# Altium PCB FullSheetOLD.PcbDoc (part 5 of 8)
Units mm, origin at the board's own origin, x right, y up, seen from the top; angles counter-clockwise.
Board outline 132.46 x 194.44 mm, 4 copper layers (Top Copper, L2_GND, L3_PWR_SIG, Bottom Copper), stack 1.586 mm thick; 495 components, 210 nets, 2171 pads, 1027 vias.
Unrouted connection lines stored in the file: 53.
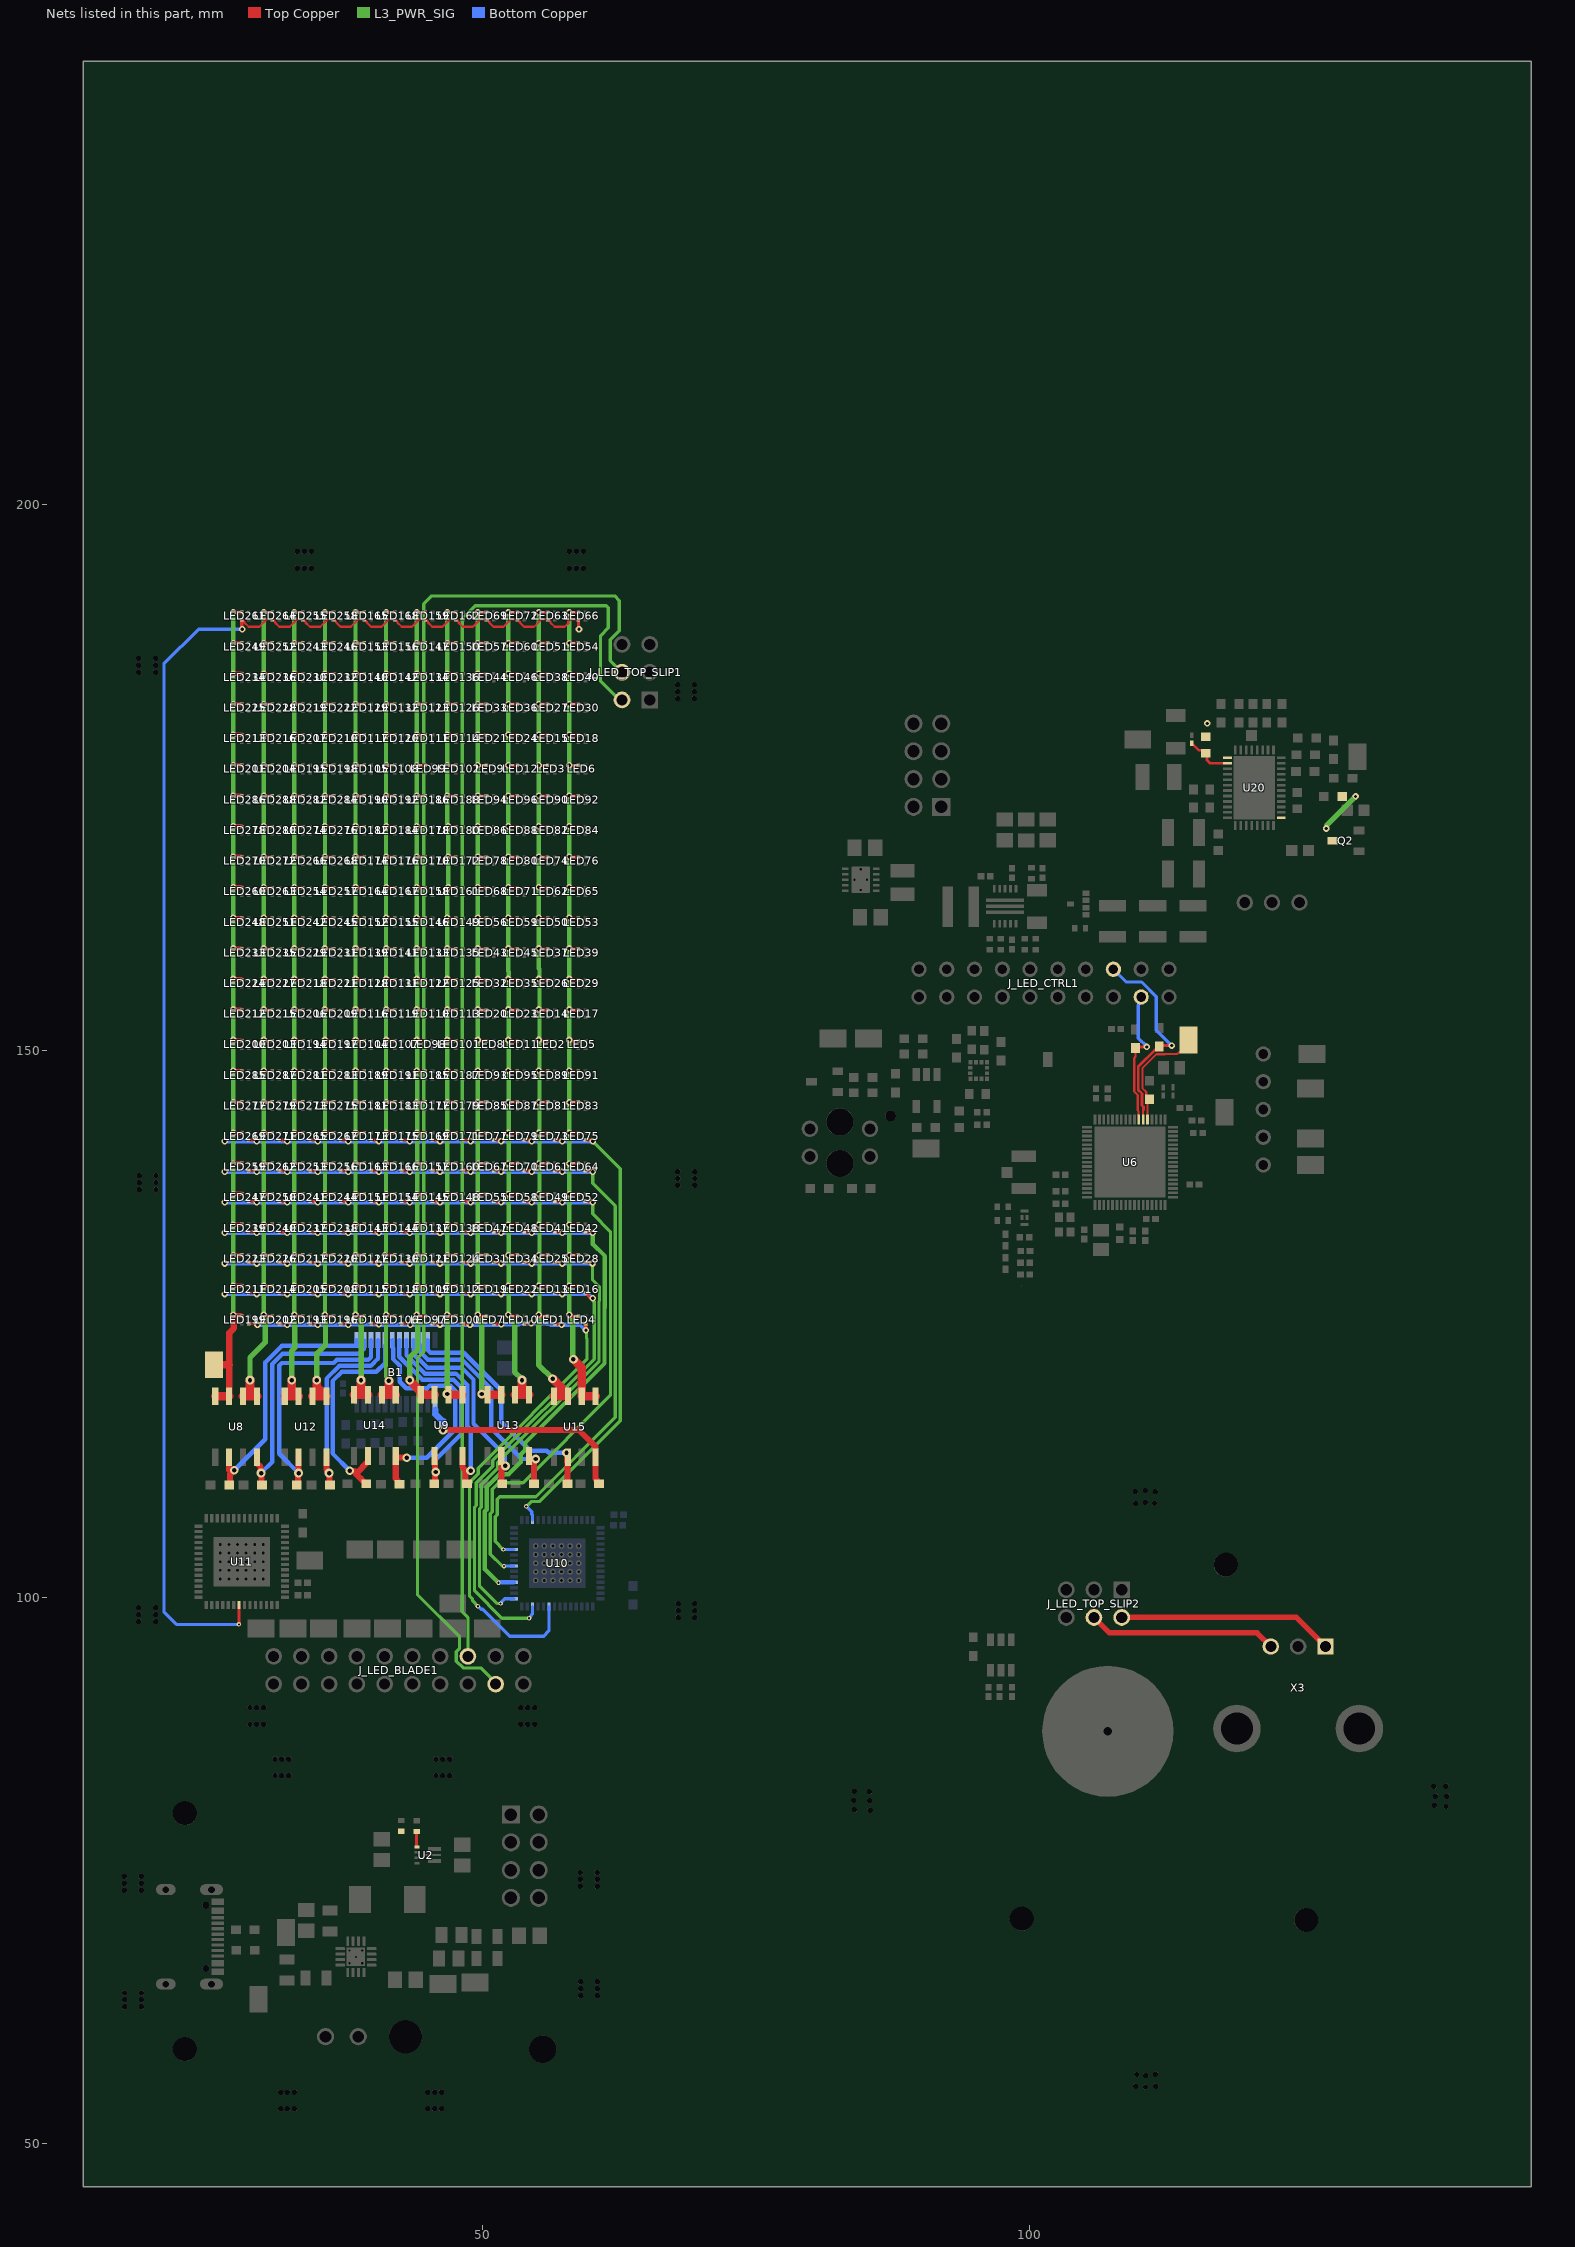
[diagram p6: the nets of this part, all layers, seen from the top]

## Via types
v1: diameter 0.6, hole 0.3, Top Copper to Bottom Copper, 857 vias
v2: diameter 0.8, hole 0.4, Top Copper to Bottom Copper, 91 vias
v3: diameter 0.4, hole 0.2, Top Copper to Bottom Copper, 79 vias

## Nets (pads, with @x,y where several pads share a name; then routed paths per layer and width w, separated by ;. In a path a pad name is that pad's centre, name@x,y a point inside that pad or via, vN(x,y) a via of type N, cw(c..) or ccw(c..) an arc to the next point about the centre after c; other vN are vias at no path point) (continued)
B23: LED63.1 LED66.1 LED69.1 LED72.1 LED159.1 LED162.1 LED165.1 LED168.1 LED255.1 LED258.1 LED261.1 LED264.1 U11.35 | length 143.6
  Top Copper w0.2: LED261.1@27.94,189.47 28.005,189.405 28.068,189.405 28.185,189.288 28.185,189.201 28.579,188.807 29.55,188.807 30.213,189.47 LED264.1@30.74,189.47 30.805,189.405 30.868,189.405 30.985,189.288 30.985,189.201 31.379,188.807 32.344,188.807 33.007,189.47 LED255.1@33.54,189.47 33.605,189.405 33.668,189.405 33.785,189.288 33.785,189.201 34.179,188.807 35.138,188.807 35.801,189.47 LED258.1@36.34,189.47 36.405,189.405 36.468,189.405 36.585,189.288 36.585,189.201 36.979,188.807 37.932,188.807 38.595,189.47 LED165.1@39.14,189.47 39.205,189.405 39.268,189.405 39.385,189.288 39.385,189.201 39.779,188.807 40.726,188.807 41.389,189.47 LED168.1@41.94,189.47 42.005,189.405 42.068,189.405 42.185,189.288 42.185,189.201 42.579,188.807 43.52,188.807 44.183,189.47 LED159.1@44.74,189.47 44.805,189.405 44.868,189.405 44.985,189.288 44.985,189.201 45.379,188.807 46.314,188.807 46.977,189.47 LED162.1@47.54,189.47 47.605,189.405 47.668,189.405 47.785,189.288 47.785,189.201 48.179,188.807 49.108,188.807 49.771,189.47 LED69.1@50.34,189.47 50.405,189.405 50.468,189.405 50.585,189.288 50.585,189.201 50.979,188.807 51.902,188.807 52.565,189.47 LED72.1@53.14,189.47 53.205,189.405 53.268,189.405 53.385,189.288 53.385,189.201 53.779,188.807 54.696,188.807 55.359,189.47 LED63.1@55.94,189.47 56.005,189.405 56.068,189.405 56.185,189.288 56.185,189.201 56.579,188.807 57.49,188.807 57.812,189.129 57.812,189.353 57.929,189.47 LED66.1@58.74,189.47
  Top Copper w0.3: v3(27.686,97.536) 27.703,97.553 U11.35@27.703,99.316 ; v1@27.95,188.638 LED261.1@27.95,189.452 ; LED66.1@58.74,189.47 58.755,189.455 58.755,188.641 v1(58.801,188.595)
  Bottom Copper w0.3: v3(27.686,97.536) 23.84,97.536 23.834,97.53 23.047,97.53 23.041,97.536 21.971,97.536 20.828,98.679 20.828,185.42 24,188.592 v1(27.996,188.592)
BOOT0: R17.2 TP7.1 U6.5 | length 11.6
  Top Copper w0.2: U6.5@110.82,143.751 110.82,145.378 110.698,145.5 110.698,146.25 110.348,146.6 110.348,148.426 111.629,149.707 112.391,149.707 112.406,149.722 113.53,149.722 113.686,149.878 113.829,149.878 114.554,150.603 TP7.1@114.554,151.003 cw(c114.556,150.803) 114.556,151.003 114.639,151.003 114.698,150.944 114.718,150.924 TP7.1@115.232,149.986
COL0_GATE: B1.1 R18.1 U8.2 | length 23.5
  Top Copper w0.55: R18.1@26.797,110.288 26.85,110.341 26.85,111.31 26.898,111.358 ; U8.2@26.797,112.827 26.801,112.822 26.801,111.644 v2@27.011,111.434 ; v2@27.011,111.379 v2@27.011,111.434 ; v2(27.272,111.64) 27.217,111.64 v2@27.011,111.434
  Bottom Copper w0.4: v2(27.272,111.64) 30.099,114.467 30.099,121.506 31.609,123.017 38.443,123.017 38.468,123.042 B1.1@38.468,123.554
COL1_GATE: B1.2 R20.1 U8.4 | length 22.9
  Top Copper w0.55: U8.4@29.337,112.827 29.337,112.292 29.67,111.959 29.67,111.427 v2(29.718,111.379) 29.762,111.335 29.762,110.332 R20.1@29.806,110.288
  Bottom Copper w0.4: v2(29.718,111.379) 30.734,112.395 30.734,121.364 31.67,122.3 38.671,122.3 39.093,122.722 39.093,123.529 B1.2@39.118,123.554
COL2_GATE: B1.3 R24.1 U12.2 | length 23.5
  Top Copper w0.55: R24.1@32.981,110.288 33.099,110.406 33.099,111.331 v2(33.147,111.379) U12.2@33.147,112.827
  Bottom Copper w0.4: v2(33.147,111.379) 31.369,113.157 31.369,121.221 31.603,121.455 36.361,121.455 36.656,121.75 39.534,121.75 39.768,121.984 B1.3@39.768,123.554
COL3_GATE: B1.4 R26.1 U12.4 | length 18.6
  Top Copper w0.55: U12.4@35.687,112.827 35.691,112.822 35.691,111.696 35.941,111.447 v2(35.941,111.379) 35.985,111.335 35.985,110.332 R26.1@36.029,110.288
  Bottom Copper w0.4: v2(35.941,111.379) 35.941,111.487 35.709,111.719 35.709,120.025 36.884,121.2 39.762,121.2 40.418,121.856 B1.4@40.418,123.554
COL4_GATE: B1.5 R28.1 U14.2 | length 20.2
  Top Copper w0.55: v2(37.839,111.6) 37.887,111.552 38.285,111.552 38.458,111.379 ; R28.1@39.331,110.415 39.281,110.415 38.848,110.847 38.848,110.876 38.345,111.379 38.458,111.379 ; U14.2@39.497,112.953 39.493,112.948 39.493,112.414 38.458,111.379
  Bottom Copper w0.4: v2(37.839,111.6) 36.259,113.18 36.259,119.798 37.111,120.65 40.259,120.65 41.068,121.459 B1.5@41.068,123.092
COL5_GATE: B1.6 R30.1 U14.4 | length 22.6
  Top Copper w0.55: R30.1@42.252,110.415 42.252,110.656 42.037,110.871 U14.4@42.037,112.953 42.037,112.828 42.041,112.824 43.005,112.824 v2(43.053,112.776)
  Bottom Copper w0.4: B1.6@41.718,123.554 41.743,123.529 41.743,122.85 41.793,122.8 41.793,121.821 42.395,121.219 42.395,119.74 42.996,119.138 44.907,119.138 45.137,119.368 47.047,119.368 47.486,118.929 47.486,115.386 44.876,112.776 v2(43.053,112.776)
COL6_GATE: B1.7 R19.1 U9.2 | length 19.7
  Top Copper w0.55: R19.1@45.554,110.415 45.624,110.485 45.624,111.415 v2(45.694,111.485) 45.643,111.535 45.643,112.903 U9.2@45.593,112.954
  Bottom Copper w0.4: B1.7@42.368,123.554 42.368,122.023 44.473,119.918 47.325,119.918 48.036,119.207 48.036,114.965 45.694,112.623 v2(45.694,111.485)
COL7_GATE: B1.8 R21.1 U9.4 | length 19.2
  Top Copper w0.55: U9.4@48.133,112.954 48.137,112.949 48.137,111.916 48.387,111.666 48.387,111.598 ; R21.1@48.563,110.415 48.438,110.54 48.435,110.54 48.435,111.567 48.852,111.567 v2(48.883,111.598)
  Bottom Copper w0.4: B1.8@43.018,123.554 43.018,122.151 44.688,120.481 47.54,120.481 48.586,119.435 48.586,115.687 48.883,115.39 v2(48.883,111.598)
COL8_GATE: B1.9 R25.1 U13.2 | length 19.5
  Top Copper w0.55: U13.2@51.689,112.954 51.689,112.419 v2(52.069,112.039) ; v2@51.693,111.956 51.693,111.506 51.693,110.498 R25.1@51.777,110.415
  Bottom Copper w0.4: B1.9@43.668,123.554 43.693,123.529 43.693,122.254 44.916,121.031 48.057,121.031 49.149,119.939 49.149,115.902 52.011,113.039 52.011,112.097 v2(52.069,112.039)
COL9_GATE: B1.10 R27.1 U13.4 | length 20.5
  Top Copper w0.55: U13.4@54.229,112.954 54.229,112.726 54.233,112.722 54.797,112.722 v2(54.845,112.674) ; R27.1@54.698,110.415 v2@54.698,112.674
  Bottom Copper w0.4: B1.10@44.318,123.092 44.318,122.407 44.958,121.767 48.099,121.767 50.758,119.108 50.758,115.485 53.569,112.674 v2(54.845,112.674)
COL10_GATE: B1.11 R29.1 U15.2 | length 22.1
  Top Copper w0.55: v2(57.664,113.241) 57.712,113.193 57.712,112.327 57.765,112.273 57.765,110.54 57.746,110.52 R29.1@57.746,110.415
  Bottom Copper w0.4: B1.11@44.968,123.554 44.968,122.641 45.217,122.392 48.252,122.392 51.689,118.955 51.689,116.078 54.343,113.424 55.858,113.424 56.041,113.241 v2(57.664,113.241)
COL11_GATE: B1.13 R31.1 U15.4 | length 19.8
  Top Copper w0.55: v2(46.355,115.316) 58.801,115.316 60.321,113.796 60.321,112.831 U15.4@60.325,112.827 ; U15.4@60.321,112.288 60.321,110.862 60.453,110.73 60.453,110.54 60.578,110.415 R31.1@60.628,110.415
  Bottom Copper w0.55: 45.668,116.765 B1.13@45.668,117.216
  Bottom Copper w0.6: 45.668,116.765 46.355,116.078
  Bottom Copper w0.7: v2(46.355,115.316) 46.355,116.078
COL_SCAN0: LED199.4 LED200.4 LED201.4 LED211.4 LED212.4 LED213.4 LED223.4 LED224.4 LED225.4 LED233.4 LED234.4 LED239.4 LED247.4 LED248.4 LED249.4 LED259.4 LED260.4 LED261.4 LED269.4 LED270.4 LED277.4 LED278.4 LED285.4 LED286.4 TP14.1 U8.7 U8.8 | length 93.3
  Top Copper w0.4: 26.775,121.285 26.797,121.307 ; v1(27.178,125.857) 27.216,125.819 27.851,125.819 LED199.4@27.94,125.73 ; v1(27.178,128.524) 27.184,128.53 LED211.4@27.94,128.53 ; v1(27.178,131.318) 27.928,131.318 LED223.4@27.94,131.33 ; v1(27.178,134.112) 27.196,134.13 LED239.4@27.94,134.13 ; v1(27.178,136.906) 27.202,136.93 LED247.4@27.94,136.93 ; v1(27.178,139.7) 27.208,139.73 LED259.4@27.94,139.73 ; v1(27.178,142.494) 27.904,142.494 LED269.4@27.94,142.53 ; v1(27.178,145.288) 27.898,145.288 LED277.4@27.94,145.33 ; v1(27.178,148.209) 27.216,148.171 27.899,148.171 LED285.4@27.94,148.13 ; v1(27.178,151.003) 27.216,150.965 27.905,150.965 LED200.4@27.94,150.93 ; v1(27.178,153.797) 27.216,153.759 27.911,153.759 LED212.4@27.94,153.73 ; v1(27.178,156.591) 27.216,156.553 27.917,156.553 LED224.4@27.94,156.53 ; v1(27.178,159.385) 27.216,159.347 27.923,159.347 LED233.4@27.94,159.33 ; v1(27.178,162.179) 27.216,162.141 27.929,162.141 LED248.4@27.94,162.13 ; v1(27.178,164.973) 27.897,164.973 LED260.4@27.94,164.93 ; v1(27.178,167.767) 27.903,167.767 LED270.4@27.94,167.73 ; v1(27.178,170.561) 27.909,170.561 LED278.4@27.94,170.53 ; v1(27.178,173.355) 27.915,173.355 LED286.4@27.94,173.33 ; v1(27.178,176.149) 27.921,176.149 LED201.4@27.94,176.13 ; v1(27.178,178.943) 27.927,178.943 LED213.4@27.94,178.93 ; v1(27.178,181.737) 27.933,181.737 LED225.4@27.94,181.73 ; v1(27.178,184.531) LED234.4@27.94,184.53 LED234.4@27.94,184.53 ; v1(27.178,187.325) 27.935,187.325 LED249.4@27.94,187.33 ; v1(27.178,190.119) 27.929,190.119 LED261.4@27.94,190.13
  Top Copper w0.6: U8.7@26.797,118.417 26.797,124.197 27.22,124.62 27.22,125.815 v1(27.178,125.857)
  Top Copper w0.7: TP14.1@25.4,121.285 26.775,121.285
  Top Copper w0.8: U8.8@25.527,118.417 U8.7@26.797,118.417
  L3_PWR_SIG w0.4: v1@27.178,125.803 v1(27.178,125.857) v1(27.178,128.524) v1(27.178,131.318) v1(27.178,134.112) v1(27.178,136.906) v1(27.178,139.7) v1(27.178,142.494) v1(27.178,145.288) v1(27.178,148.209) v1(27.178,151.003) v1(27.178,153.797) v1(27.178,156.591) v1(27.178,159.385) v1(27.178,162.179) v1(27.178,164.973) v1(27.178,167.767) v1(27.178,170.561) v1(27.178,173.355) v1(27.178,176.149) v1(27.178,178.943) v1(27.178,181.737) v1(27.178,184.531) v1(27.178,187.325) v1(27.178,190.119)
COL_SCAN1: LED202.4 LED203.4 LED204.4 LED214.4 LED215.4 LED216.4 LED226.4 LED227.4 LED228.4 LED235.4 LED236.4 LED240.4 LED250.4 LED251.4 LED252.4 LED262.4 LED263.4 LED264.4 LED271.4 LED272.4 LED279.4 LED280.4 LED287.4 LED288.4 U8.5 U8.6 | length 92.2
  Top Copper w0.3: v1@29.845,136.906 LED250.4@30.649,136.906 ; v1@29.845,139.7 LED262.4@30.643,139.7 ; v1@29.845,181.737 LED228.4@30.666,181.737 ; v1@29.846,184.53 LED236.4@30.672,184.53 ; v1@29.847,187.327 LED252.4@30.67,187.327 ; v1@29.851,190.125 LED264.4@30.667,190.125 ; v1@29.851,128.53 LED214.4@30.673,128.53 ; v1@29.857,131.33 LED226.4@30.673,131.33 ; v1@29.858,178.93 LED216.4@30.673,178.93 ; v1@29.863,134.13 LED240.4@30.673,134.13 ; v1@29.864,176.13 LED204.4@30.673,176.13 ; v1@29.87,173.33 LED288.4@30.673,173.33 ; v1@29.876,170.53 LED280.4@30.673,170.53 ; v1@29.881,142.53 LED271.4@30.673,142.53 ; v1@29.882,167.73 LED272.4@30.673,167.73 ; v1@29.883,145.326 LED279.4@30.669,145.326 ; v1@29.883,164.935 LED263.4@30.668,164.935 ; v1@29.894,162.13 LED251.4@30.673,162.13 ; v1@29.9,159.33 LED235.4@30.673,159.33 ; v1@29.987,156.53 LED227.4@30.673,156.53 ; v1@29.993,153.73 LED215.4@30.673,153.73 ; v1@29.999,150.93 LED203.4@30.673,150.93 ; v1@30.005,148.13 LED287.4@30.673,148.13 ; v1@30.053,125.73 LED202.4@30.673,125.73
  Top Copper w0.8: U8.6@28.067,118.417 28.702,118.417 ; v2(28.702,119.888) 28.702,118.417 ; U8.5@29.337,118.417 28.702,118.417
  L3_PWR_SIG w0.4: v1(29.972,125.857) v1(29.972,128.524) v1(29.972,131.318) v1(29.972,134.112) v1(29.972,136.906) v1(29.972,139.7) v1(29.972,142.494) v1(29.972,145.288) v1(29.972,148.209) v1(29.972,151.003) v1(29.972,153.797) v1(29.972,156.591) v1(29.972,159.385) v1(29.972,162.179) v1(29.972,164.973) v1(29.972,167.767) v1(29.972,170.561) v1(29.972,173.355) v1(29.972,176.149) v1(29.972,178.943) v1(29.972,181.737) v1(29.972,184.531) v1(29.972,187.325) v1(29.972,190.119)
  L3_PWR_SIG w0.5: v2(28.702,119.888) 28.702,121.939 30.091,123.327 30.091,125.711 29.972,125.83 v1(29.972,125.857)
COL_SCAN2: LED193.4 LED194.4 LED195.4 LED205.4 LED206.4 LED207.4 LED217.4 LED218.4 LED219.4 LED229.4 LED230.4 LED237.4 LED241.4 LED242.4 LED243.4 LED253.4 LED254.4 LED255.4 LED265.4 LED266.4 LED273.4 LED274.4 LED281.4 LED282.4 U12.7 U12.8 | length 91.7
  Top Copper w0.3: v1@32.639,136.906 LED241.4@33.443,136.906 ; v1@32.639,139.7 LED253.4@33.437,139.7 ; v1@32.639,181.737 LED219.4@33.46,181.737 ; v1@32.64,184.53 LED230.4@33.466,184.53 ; v1@32.641,187.327 LED243.4@33.465,187.327 ; v1@32.645,190.125 LED255.4@33.461,190.125 ; v1@32.645,128.53 LED205.4@33.467,128.53 ; v1@32.651,131.33 LED217.4@33.467,131.33 ; v1@32.652,178.93 LED207.4@33.467,178.93 ; v1@32.657,134.13 LED237.4@33.467,134.13 ; v1@32.658,176.13 LED195.4@33.467,176.13 ; v1@32.664,173.33 LED282.4@33.467,173.33 ; v1@32.67,170.53 LED274.4@33.467,170.53 ; v1@32.675,142.53 LED265.4@33.467,142.53 ; v1@32.676,167.73 LED266.4@33.467,167.73 ; v1@32.677,145.326 LED273.4@33.463,145.326 ; v1@32.677,164.935 LED254.4@33.462,164.935 ; v1@32.688,162.13 LED242.4@33.467,162.13 ; v1@32.694,159.33 LED229.4@33.467,159.33 ; v1@32.781,156.53 LED218.4@33.467,156.53 ; v1@32.787,153.73 LED206.4@33.467,153.73 ; v1@32.793,150.93 LED194.4@33.467,150.93 ; v1@32.799,148.13 LED281.4@33.467,148.13 ; v1@32.847,125.73 LED193.4@33.467,125.73
  Top Copper w0.8: U12.8@31.877,118.417 32.512,118.417 ; v2(32.512,119.888) 32.512,118.417 ; U12.7@33.147,118.417 32.512,118.417
  L3_PWR_SIG w0.4: v1(32.766,125.857) v1(32.766,128.524) v1(32.766,131.318) v1(32.766,134.112) v1(32.766,136.906) v1(32.766,139.7) v1(32.766,142.494) v1(32.766,145.288) v1(32.766,148.209) v1(32.766,151.003) v1(32.766,153.797) v1(32.766,156.591) v1(32.766,159.385) v1(32.766,162.179) v1(32.766,164.973) v1(32.766,167.767) v1(32.766,170.561) v1(32.766,173.355) v1(32.766,176.149) v1(32.766,178.943) v1(32.766,181.737) v1(32.766,184.531) v1(32.766,187.325) v1(32.766,190.119)
  L3_PWR_SIG w0.5: v2(32.512,119.888) 32.512,122.552 32.816,122.856 32.816,125.78 32.766,125.83 v1(32.766,125.857)
COL_SCAN3: LED196.4 LED197.4 LED198.4 LED208.4 LED209.4 LED210.4 LED220.4 LED221.4 LED222.4 LED231.4 LED232.4 LED238.4 LED244.4 LED245.4 LED246.4 LED256.4 LED257.4 LED258.4 LED267.4 LED268.4 LED275.4 LED276.4 LED283.4 LED284.4 U12.5 U12.6 | length 92
  Top Copper w0.3: v1@35.433,136.906 v1(35.56,136.906) LED244.4@36.237,136.906 ; v1@35.433,139.7 v1(35.56,139.7) LED256.4@36.231,139.7 ; v1@35.433,181.737 v1(35.56,181.737) LED222.4@36.254,181.737 ; v1@35.434,184.53 LED232.4@36.26,184.53 ; v1@35.435,187.327 LED246.4@36.258,187.327 ; v1@35.439,190.125 LED258.4@36.255,190.125 ; v1@35.439,128.53 LED208.4@36.261,128.53 ; v1@35.445,131.33 LED220.4@36.261,131.33 ; v1@35.446,178.93 LED210.4@36.261,178.93 ; v1@35.451,134.13 LED238.4@36.261,134.13 ; v1@35.452,176.13 LED198.4@36.261,176.13 ; v1@35.458,173.33 LED284.4@36.261,173.33 ; v1@35.464,170.53 LED276.4@36.261,170.53 ; v1@35.469,142.53 LED267.4@36.261,142.53 ; v1@35.47,167.73 LED268.4@36.261,167.73 ; v1@35.471,145.326 LED275.4@36.257,145.326 ; v1@35.471,164.935 LED257.4@36.256,164.935 ; v1@35.482,162.13 LED245.4@36.261,162.13 ; v1@35.488,159.33 LED231.4@36.261,159.33 ; v1@35.575,156.53 LED221.4@36.261,156.53 ; v1@35.581,153.73 LED209.4@36.261,153.73 ; v1@35.587,150.93 LED197.4@36.261,150.93 ; v1@35.593,148.13 LED283.4@36.261,148.13 ; v1@35.641,125.73 LED196.4@36.261,125.73
  Top Copper w0.8: U12.6@34.417,118.417 35.052,118.417 ; v2(34.798,119.888) 34.798,119.253 35.052,118.999 35.052,118.417 ; U12.5@35.687,118.417 35.052,118.417
  L3_PWR_SIG w0.4: v1(35.56,125.857) v1(35.56,128.524) v1(35.56,131.318) v1(35.56,134.112) v1(35.56,136.906) v1(35.56,139.7) v1(35.56,142.494) v1(35.56,145.288) v1(35.56,148.209) v1(35.56,151.003) v1(35.56,153.797) v1(35.56,156.591) v1(35.56,159.385) v1(35.56,162.179) v1(35.56,164.973) v1(35.56,167.767) v1(35.56,170.561) v1(35.56,173.355) v1(35.56,176.149) v1(35.56,178.943) v1(35.56,181.737) v1(35.56,184.531) v1(35.56,187.325) v1(35.56,190.119)
  L3_PWR_SIG w0.5: v2(34.798,119.888) 34.798,122.298 35.61,123.11 35.61,125.78 35.56,125.83 v1(35.56,125.857)
COL_SCAN4: LED103.4 LED104.4 LED105.4 LED115.4 LED116.4 LED117.4 LED127.4 LED128.4 LED129.4 LED139.4 LED140.4 LED143.4 LED151.4 LED152.4 LED153.4 LED163.4 LED164.4 LED165.4 LED173.4 LED174.4 LED181.4 LED182.4 LED189.4 LED190.4 U14.7 U14.8 | length 91.7
  Top Copper w0.3: v1@38.227,136.906 LED151.4@39.031,136.906 ; v1@38.227,139.7 LED163.4@39.025,139.7 ; v1@38.227,181.737 LED129.4@39.048,181.737 ; v1@38.228,184.53 LED140.4@39.054,184.53 ; v1@38.229,187.327 LED153.4@39.052,187.327 ; v1@38.233,190.125 LED165.4@39.049,190.125 ; v1@38.233,128.53 LED115.4@39.055,128.53 ; v1@38.239,131.33 LED127.4@39.055,131.33 ; v1@38.24,178.93 LED117.4@39.055,178.93 ; v1@38.245,134.13 LED143.4@39.055,134.13 ; v1@38.246,176.13 LED105.4@39.055,176.13 ; v1@38.252,173.33 LED190.4@39.055,173.33 ; v1@38.258,170.53 LED182.4@39.055,170.53 ; v1@38.263,142.53 LED173.4@39.055,142.53 ; v1@38.264,167.73 LED174.4@39.055,167.73 ; v1@38.265,145.326 LED181.4@39.051,145.326 ; v1@38.265,164.935 LED164.4@39.05,164.935 ; v1@38.276,162.13 LED152.4@39.055,162.13 ; v1@38.282,159.33 LED139.4@39.055,159.33 ; v1@38.369,156.53 LED128.4@39.055,156.53 ; v1@38.375,153.73 LED116.4@39.055,153.73 ; v1@38.381,150.93 LED104.4@39.055,150.93 ; v1@38.387,148.13 LED189.4@39.055,148.13 ; v1@38.435,125.73 LED103.4@39.055,125.73
  Top Copper w0.8: U14.8@38.227,118.543 38.862,118.543 ; v2(38.862,119.888) 38.862,118.543 ; U14.7@39.497,118.543 38.862,118.543
  L3_PWR_SIG w0.4: v1(38.354,125.857) v1(38.354,128.524) v1(38.354,131.318) v1(38.354,134.112) v1(38.354,136.906) v1(38.354,139.7) v1(38.354,142.494) v1(38.354,145.288) v1(38.354,148.209) v1(38.354,151.003) v1(38.354,153.797) v1(38.354,156.591) v1(38.354,159.385) v1(38.354,162.179) v1(38.354,164.973) v1(38.354,167.767) v1(38.354,170.561) v1(38.354,173.355) v1(38.354,176.149) v1(38.354,178.943) v1(38.354,181.737) v1(38.354,184.531) v1(38.354,187.325) v1(38.354,190.119)
  L3_PWR_SIG w0.5: v1(38.354,125.857) 38.354,125.83 38.862,125.322 v2(38.862,119.888)
COL_SCAN5: LED106.4 LED107.4 LED108.4 LED118.4 LED119.4 LED120.4 LED130.4 LED131.4 LED132.4 LED141.4 LED142.4 LED144.4 LED154.4 LED155.4 LED156.4 LED166.4 LED167.4 LED168.4 LED175.4 LED176.4 LED183.4 LED184.4 LED191.4 LED192.4 U14.5 U14.6 | length 91.5
  Top Copper w0.3: v1@41.021,136.906 LED154.4@41.825,136.906 ; v1@41.021,181.737 LED132.4@41.842,181.737 ; v1@41.022,184.53 LED142.4@41.848,184.53 ; v1@41.023,187.327 LED156.4@41.846,187.327 ; v1@41.027,190.125 LED168.4@41.843,190.125 ; v1@41.027,128.53 LED118.4@41.849,128.53 ; v1@41.034,178.93 LED120.4@41.849,178.93 ; v1@41.039,134.13 LED144.4@41.849,134.13 ; v1@41.04,176.13 LED108.4@41.849,176.13 ; v1@41.046,173.33 LED192.4@41.849,173.33 ; v1(41.048,131.318) 41.06,131.33 LED130.4@41.849,131.33 ; v1@41.052,170.53 LED184.4@41.849,170.53 ; v1@41.057,142.53 LED175.4@41.849,142.53 ; v1@41.058,167.73 LED176.4@41.849,167.73 ; v1@41.059,145.326 LED183.4@41.845,145.326 ; v1@41.059,164.935 LED167.4@41.844,164.935 ; v1@41.07,162.13 LED155.4@41.849,162.13 ; v1@41.076,159.33 LED141.4@41.849,159.33 ; v1(41.117,139.716) 41.133,139.7 LED166.4@41.819,139.7 ; v1@41.163,156.53 LED131.4@41.849,156.53 ; v1@41.169,153.73 LED119.4@41.849,153.73 ; v1@41.175,150.93 LED107.4@41.849,150.93 ; v1@41.181,148.13 LED191.4@41.849,148.13 ; v1@41.229,125.73 LED106.4@41.849,125.73
  Top Copper w0.8: U14.6@40.767,118.543 41.402,118.543 ; v2(41.409,119.836) 41.409,118.55 41.402,118.543 ; U14.5@42.037,118.543 41.402,118.543
  L3_PWR_SIG w0.4: v1(41.048,131.318) 41.048,131.264 41.148,131.164 v1(41.148,128.524) v1(41.148,125.857) 41.148,120.206 41.409,119.944 v2(41.409,119.836) ; v1(41.117,139.716) 41.132,139.701 41.148,139.685 v1(41.148,136.906) v1(41.148,134.112) v1@41.148,131.318 ; v1@41.148,139.716 v1(41.148,142.494) v1(41.148,145.288) v1(41.148,148.209) v1(41.148,151.003) v1(41.148,153.797) v1(41.148,156.591) v1(41.148,159.385) v1(41.148,162.179) v1(41.148,164.973) v1(41.148,167.767) v1(41.148,170.561) v1(41.148,173.355) v1(41.148,176.149) v1(41.148,178.943) v1(41.148,181.737) v1(41.148,184.531) v1(41.148,187.325) v1(41.148,190.119)
COL_SCAN6: LED97.4 LED98.4 LED99.4 LED109.4 LED110.4 LED111.4 LED121.4 LED122.4 LED123.4 LED133.4 LED134.4 LED137.4 LED145.4 LED146.4 LED147.4 LED157.4 LED158.4 LED159.4 LED169.4 LED170.4 LED177.4 LED178.4 LED185.4 LED186.4 U9.7 U9.8 | length 92.3
  Top Copper w0.3: v1@43.815,136.906 LED145.4@44.619,136.906 ; v1@43.815,139.7 LED157.4@44.613,139.7 ; v1@43.815,181.737 LED123.4@44.636,181.737 ; v1@43.816,184.53 LED134.4@44.642,184.53 ; v1@43.817,187.327 LED147.4@44.64,187.327 ; v1@43.821,190.125 LED159.4@44.637,190.125 ; v1@43.821,128.53 LED109.4@44.643,128.53 ; v1@43.827,131.33 LED121.4@44.643,131.33 ; v1@43.828,178.93 LED111.4@44.643,178.93 ; v1@43.833,134.13 LED137.4@44.643,134.13 ; v1@43.834,176.13 LED99.4@44.643,176.13 ; v1@43.84,173.33 LED186.4@44.643,173.33 ; v1@43.846,170.53 LED178.4@44.643,170.53 ; v1@43.851,142.53 LED169.4@44.643,142.53 ; v1@43.852,167.73 LED170.4@44.643,167.73 ; v1@43.853,145.326 LED177.4@44.639,145.326 ; v1@43.853,164.935 LED158.4@44.638,164.935 ; v1@43.864,162.13 LED146.4@44.643,162.13 ; v1@43.87,159.33 LED133.4@44.643,159.33 ; v1@43.957,156.53 LED122.4@44.643,156.53 ; v1@43.963,153.73 LED110.4@44.643,153.73 ; v1@43.969,150.93 LED98.4@44.643,150.93 ; v1@43.975,148.13 LED185.4@44.643,148.13 ; v1@44.023,125.73 LED97.4@44.643,125.73
  Top Copper w0.8: v2(43.307,119.888) 43.307,119.853 44.323,118.837 U9.8@44.323,118.544 U9.7@45.593,118.544
  L3_PWR_SIG w0.4: v1@43.942,125.806 v1(43.942,125.857) ; v1(43.942,190.119) v1(43.942,187.325) v1(43.942,184.531) v1(43.942,181.737) v1(43.942,178.943) v1(43.942,176.149) v1(43.942,173.355) v1(43.942,170.561) v1(43.942,167.767) v1(43.942,164.973) v1(43.942,162.179) v1(43.942,159.385) 43.942,157.175 44.011,157.106 44.011,156.591 44.011,136.906 44.011,134.112 44.011,131.318 44.011,128.524 v1@44.011,125.857
  L3_PWR_SIG w0.5: v2(43.307,119.888) 43.307,121.946 44.061,122.7 44.061,125.226 43.961,125.326 43.961,125.838 v1(43.942,125.857)
  other v1: 43.942,128.524 43.942,131.318 43.942,134.112 43.942,136.906 43.942,139.7 43.942,142.494 43.942,145.288 43.942,148.209 43.942,151.003 43.942,153.797 43.942,156.591
COL_SCAN7: LED100.4 LED101.4 LED102.4 LED112.4 LED113.4 LED114.4 LED124.4 LED125.4 LED126.4 LED135.4 LED136.4 LED138.4 LED148.4 LED149.4 LED150.4 LED160.4 LED161.4 LED162.4 LED171.4 LED172.4 LED179.4 LED180.4 LED187.4 LED188.4 U9.5 U9.6 | length 92.1
  Top Copper w0.3: v1(46.736,136.906) LED148.4@47.54,136.906 ; v1(46.736,139.7) LED160.4@47.534,139.7 ; v1(46.736,181.737) LED126.4@47.557,181.737 ; v1(46.736,184.531) LED136.4@47.563,184.53 ; v1@46.738,187.327 LED150.4@47.561,187.327 ; v1@46.742,190.125 LED162.4@47.558,190.125 ; v1@46.742,128.53 LED112.4@47.54,128.53 LED112.4@47.564,128.53 ; v1@46.748,131.33 LED124.4@47.54,131.33 ; v1@46.749,178.93 LED114.4@47.54,178.93 LED114.4@47.564,178.93 ; v1@46.754,134.13 LED138.4@47.54,134.13 LED138.4@47.564,134.13 ; v1@46.755,176.13 LED102.4@47.54,176.13 LED102.4@47.564,176.13 ; v1@46.761,173.33 LED188.4@47.54,173.33 LED188.4@47.564,173.33 ; v1@46.772,142.53 LED171.4@47.54,142.53 LED171.4@47.564,142.53 ; v1@46.774,145.326 LED179.4@47.56,145.326 ; v1@46.785,162.13 LED149.4@47.54,162.13 LED149.4@47.564,162.13 ; v1@46.791,159.33 LED135.4@47.54,159.33 LED135.4@47.564,159.33 ; v1(46.828,164.973) 46.866,164.935 LED161.4@47.559,164.935 ; v1(46.828,167.767) 46.85,167.745 47.525,167.745 LED172.4@47.54,167.73 ; v1(46.828,170.561) 46.844,170.545 47.525,170.545 LED180.4@47.54,170.53 ; v1@46.878,156.53 LED125.4@47.54,156.53 LED125.4@47.564,156.53 ; v1@46.884,153.73 LED113.4@47.54,153.73 LED113.4@47.564,153.73 ; v1@46.89,150.93 LED101.4@47.54,150.93 LED101.4@47.564,150.93 ; v1@46.896,148.13 LED187.4@47.54,148.13 LED187.4@47.564,148.13 ; v1@46.944,125.73 LED100.4@47.54,125.73 LED100.4@47.564,125.73
  Top Copper w0.8: v2(46.736,118.618) 46.81,118.544 47.498,118.544 ; U9.6@46.863,118.544 47.498,118.544 ; U9.5@48.133,118.544 47.498,118.544
  L3_PWR_SIG w0.4: v1@46.736,125.83 v1(46.736,125.857) v1(46.736,128.524) v1(46.736,131.318) v1(46.736,134.112) v1(46.736,136.906) v1(46.736,139.7) v1(46.736,142.494) v1(46.736,145.288) v1(46.736,148.209) v1(46.736,151.003) v1(46.736,153.797) v1(46.736,156.591) v1(46.736,159.385) v1(46.736,162.179) 46.736,164.827 46.828,164.919 v1(46.828,164.973) ; v1@46.736,164.973 46.828,165.065 v1(46.828,167.767) ; v1@46.736,167.767 46.828,167.859 v1(46.828,170.561) ; v1@46.736,170.561 v1(46.736,173.355) v1(46.736,176.149) v1(46.736,178.943) v1(46.736,181.737) v1(46.736,184.531) v1(46.736,187.325) v1(46.736,190.119)
  L3_PWR_SIG w0.5: v2(46.736,118.618) 46.736,124.557 46.786,124.607 46.786,125.261 46.755,125.292 46.755,125.811 v1@46.736,125.83
COL_SCAN8: LED7.4 LED8.4 LED9.4 LED19.4 LED20.4 LED21.4 LED31.4 LED32.4 LED33.4 LED43.4 LED44.4 LED47.4 LED55.4 LED56.4 LED57.4 LED67.4 LED68.4 LED69.4 LED77.4 LED78.4 LED85.4 LED86.4 LED93.4 LED94.4 U13.7 U13.8 | length 92.1
  Top Copper w0.3: v1(49.53,136.906) LED55.4@50.334,136.906 ; v1(49.53,139.7) LED67.4@50.328,139.7 ; v1(49.53,181.737) LED33.4@50.351,181.737 ; v1(49.53,184.531) LED44.4@50.357,184.53 ; v1@49.532,187.327 LED57.4@50.355,187.327 ; v1@49.536,190.125 LED69.4@50.352,190.125 ; v1@49.536,128.53 LED19.4@50.358,128.53 ; v1@49.542,131.33 LED31.4@50.358,131.33 ; v1@49.543,178.93 LED21.4@50.358,178.93 ; v1@49.548,134.13 LED47.4@50.358,134.13 ; v1@49.549,176.13 LED9.4@50.358,176.13 ; v1@49.555,173.33 LED94.4@50.358,173.33 ; v1@49.561,170.53 LED86.4@50.358,170.53 ; v1@49.566,142.53 LED77.4@50.358,142.53 ; v1@49.567,167.73 LED78.4@50.358,167.73 ; v1@49.568,145.326 LED85.4@50.354,145.326 ; v1@49.568,164.935 LED68.4@50.353,164.935 ; v1@49.579,162.13 LED56.4@50.358,162.13 ; v1@49.585,159.33 LED43.4@50.358,159.33 ; v1@49.672,156.53 LED32.4@50.358,156.53 ; v1@49.678,153.73 LED20.4@50.358,153.73 ; v1@49.684,150.93 LED8.4@50.358,150.93 ; v1@49.69,148.13 LED93.4@50.358,148.13 ; v1@49.738,125.73 LED7.4@50.358,125.73
  Top Copper w0.8: v2(49.899,118.618) 50.345,118.618 U13.8@50.419,118.544 U13.7@51.689,118.544
  L3_PWR_SIG w0.4: v1@49.53,125.803 v1(49.53,128.524) v1(49.53,131.318) v1(49.53,134.112) v1(49.53,136.906) v1(49.53,139.7) v1(49.53,142.494) v1(49.53,145.288) v1(49.53,148.209) v1(49.53,151.003) v1(49.53,153.797) v1(49.53,156.591) v1(49.53,159.385) v1(49.53,162.179) v1(49.53,164.973) v1(49.53,167.767) v1(49.53,170.561) v1(49.53,173.355) v1(49.53,176.149) v1(49.53,178.943) v1(49.53,181.737) v1(49.53,184.531) v1(49.53,187.325) v1(49.53,190.119)
  L3_PWR_SIG w0.5: v1(49.53,125.857) 49.53,125.83 49.899,125.461 v2(49.899,118.618)
COL_SCAN9: LED10.4 LED11.4 LED12.4 LED22.4 LED23.4 LED24.4 LED34.4 LED35.4 LED36.4 LED45.4 LED46.4 LED48.4 LED58.4 LED59.4 LED60.4 LED70.4 LED71.4 LED72.4 LED79.4 LED80.4 LED87.4 LED88.4 LED95.4 LED96.4 U13.5 U13.6 | length 92
  Top Copper w0.3: v1(52.324,136.906) LED58.4@53.128,136.906 ; v1(52.324,139.7) LED70.4@53.122,139.7 ; v1(52.324,181.737) LED36.4@53.145,181.737 ; v1(52.324,184.531) LED46.4@53.151,184.53 ; v1@52.326,187.327 LED60.4@53.149,187.327 ; v1@52.33,190.125 LED72.4@53.146,190.125 ; v1@52.33,128.53 LED22.4@53.152,128.53 ; v1@52.336,131.33 LED34.4@53.152,131.33 ; v1@52.337,178.93 LED24.4@53.152,178.93 ; v1@52.342,134.13 LED48.4@53.152,134.13 ; v1@52.343,176.13 LED12.4@53.152,176.13 ; v1@52.349,173.33 LED96.4@53.152,173.33 ; v1@52.355,170.53 LED88.4@53.152,170.53 ; v1@52.36,142.53 LED79.4@53.152,142.53 ; v1@52.361,167.73 LED80.4@53.152,167.73 ; v1@52.362,145.326 LED87.4@53.148,145.326 ; v1@52.362,164.935 LED71.4@53.147,164.935 ; v1@52.373,162.13 LED59.4@53.152,162.13 ; v1@52.379,159.33 LED45.4@53.152,159.33 ; v1@52.466,156.53 LED35.4@53.152,156.53 ; v1@52.472,153.73 LED23.4@53.152,153.73 ; v1@52.478,150.93 LED11.4@53.152,150.93 ; v1@52.484,148.13 LED95.4@53.152,148.13 ; v1@52.532,125.73 LED10.4@53.152,125.73
  Top Copper w0.8: U13.6@52.959,118.544 53.594,118.544 ; v2(53.594,119.888) 53.594,118.544 ; U13.5@54.229,118.544 53.594,118.544
  L3_PWR_SIG w0.4: v1@52.324,125.824 v1(52.324,125.857) ; v1(52.324,190.119) v1(52.324,187.325) v1(52.324,184.531) v1(52.324,181.737) v1(52.324,178.943) v1(52.324,176.149) v1(52.324,173.355) v1(52.324,170.561) v1(52.324,167.767) v1(52.324,164.973) v1(52.324,162.179) v1(52.324,159.385) 52.324,157.302 52.391,157.235 52.391,148.209 v1@52.391,125.857
  L3_PWR_SIG w0.5: v1(52.324,125.857) 52.324,125.83 52.921,125.233 52.921,120.642 53.594,119.969 v2(53.594,119.888)
  other v1: 52.324,128.524 52.324,131.318 52.324,134.112 52.324,142.494 52.324,145.288 52.324,148.209 52.324,151.003 52.324,153.797 52.324,156.591
COL_SCAN10: LED1.4 LED2.4 LED3.4 LED13.4 LED14.4 LED15.4 LED25.4 LED26.4 LED27.4 LED37.4 LED38.4 LED41.4 LED49.4 LED50.4 LED51.4 LED61.4 LED62.4 LED63.4 LED73.4 LED74.4 LED81.4 LED82.4 LED89.4 LED90.4 U15.7 U15.8 | length 92.5
  Top Copper w0.3: v1(55.118,136.906) LED49.4@55.922,136.906 ; v1(55.118,139.7) LED61.4@55.916,139.7 ; v1(55.118,181.737) LED27.4@55.939,181.737 ; v1(55.118,184.531) LED38.4@55.945,184.53 ; v1@55.12,187.327 LED51.4@55.944,187.327 ; v1@55.124,190.125 LED63.4@55.94,190.125 ; v1@55.124,128.53 LED13.4@55.946,128.53 ; v1@55.13,131.33 LED25.4@55.946,131.33 ; v1@55.131,178.93 LED15.4@55.946,178.93 ; v1@55.136,134.13 LED41.4@55.946,134.13 ; v1@55.137,176.13 LED3.4@55.946,176.13 ; v1@55.143,173.33 LED90.4@55.946,173.33 ; v1@55.149,170.53 LED82.4@55.946,170.53 ; v1@55.154,142.53 LED73.4@55.946,142.53 ; v1@55.155,167.73 LED74.4@55.946,167.73 ; v1@55.156,145.326 LED81.4@55.942,145.326 ; v1@55.156,164.935 LED62.4@55.941,164.935 ; v1@55.167,162.13 LED50.4@55.946,162.13 ; v1@55.173,159.33 LED37.4@55.946,159.33 ; v1@55.26,156.53 LED26.4@55.946,156.53 ; v1@55.266,153.73 LED14.4@55.946,153.73 ; v1@55.272,150.93 LED2.4@55.946,150.93 ; v1@55.278,148.13 LED89.4@55.946,148.13 ; v1@55.326,125.73 LED1.4@55.946,125.73
  Top Copper w0.8: v2(56.388,120.015) 57.15,119.253 57.15,118.417 ; U15.8@56.515,118.417 57.15,118.417 ; U15.7@57.785,118.417 57.15,118.417
  L3_PWR_SIG w0.4: v1@55.118,125.83 v1(55.118,125.857) ; v1(55.118,190.119) 55.133,190.104 55.133,178.943 55.133,157.551 55.187,157.497 55.187,136.906 55.187,134.112 55.187,131.318 55.187,128.524 v1@55.187,125.857
  L3_PWR_SIG w0.5: v1(55.118,125.857) 55.118,121.285 v2(56.388,120.015)
  other v1: 55.118,128.524 55.118,131.318 55.118,134.112 55.118,142.494 55.118,145.288 55.118,148.209 55.118,151.003 55.118,153.797 55.118,156.591 55.118,159.385 55.118,162.179 55.118,164.973 55.118,167.767 55.118,170.561 55.118,173.355 55.118,176.149 55.118,178.943 55.118,187.325
COL_SCAN11: LED4.4 LED5.4 LED6.4 LED16.4 LED17.4 LED18.4 LED28.4 LED29.4 LED30.4 LED39.4 LED40.4 LED42.4 LED52.4 LED53.4 LED54.4 LED64.4 LED65.4 LED66.4 LED75.4 LED76.4 LED83.4 LED84.4 LED91.4 LED92.4 U15.5 U15.6 | length 93.7
  Top Copper w0.3: v1(57.912,125.857) 57.993,125.857 58.12,125.73 LED4.4@58.74,125.73 ; v1(57.912,128.524) 57.918,128.53 LED16.4@58.74,128.53 ; v1(57.912,131.318) 57.924,131.33 LED28.4@58.74,131.33 ; v1(57.912,134.112) 57.93,134.13 LED42.4@58.74,134.13 ; v1(57.912,136.906) 58.716,136.906 LED52.4@58.74,136.93 ; v1(57.912,139.7) 58.71,139.7 LED64.4@58.74,139.73 ; v1(57.912,142.494) 57.948,142.53 LED75.4@58.74,142.53 ; v1(57.912,145.288) 57.95,145.326 58.736,145.326 LED83.4@58.74,145.33 ; v1(57.912,148.209) 57.993,148.209 58.072,148.13 LED91.4@58.74,148.13 ; v1(57.912,151.003) 57.993,151.003 58.066,150.93 LED5.4@58.74,150.93 ; v1(57.912,153.797) 57.993,153.797 58.06,153.73 LED17.4@58.74,153.73 ; v1(57.912,156.591) 57.993,156.591 58.054,156.53 LED29.4@58.74,156.53 ; v1(57.912,159.385) 57.967,159.33 LED39.4@58.74,159.33 ; v1(57.912,162.179) 57.961,162.13 LED53.4@58.74,162.13 ; v1(57.912,164.973) 57.95,164.935 58.735,164.935 LED65.4@58.74,164.93 ; v1(57.912,167.767) 57.949,167.73 LED76.4@58.74,167.73 ; v1(57.912,170.561) 57.943,170.53 LED84.4@58.74,170.53 ; v1(57.912,173.355) 57.937,173.33 LED92.4@58.74,173.33 ; v1(57.912,176.149) 57.931,176.13 LED6.4@58.74,176.13 ; v1(57.912,178.943) 57.925,178.93 LED18.4@58.74,178.93 ; v1(57.912,181.737) 58.733,181.737 LED30.4@58.74,181.73 ; v1(57.912,184.531) LED40.4@58.74,184.53 ; v1(57.912,187.325) 57.914,187.327 58.737,187.327 LED54.4@58.74,187.33 ; v1(57.912,190.119) 57.918,190.125 58.734,190.125 LED66.4@58.74,190.13
  Top Copper w0.8: v2(58.293,121.793) 59.055,121.031 U15.6@59.055,118.417 U15.5@60.325,118.417
  L3_PWR_SIG w0.4: v1(57.912,125.857) v1(57.912,128.524) v1(57.912,131.318) v1(57.912,134.112) v1(57.912,136.906) v1(57.912,139.7) v1(57.912,142.494) v1(57.912,145.288) v1(57.912,148.209) v1(57.912,151.003) v1(57.912,153.797) v1(57.912,156.591) v1(57.912,159.385) v1(57.912,162.179) v1(57.912,164.973) v1(57.912,167.767) v1(57.912,170.561) v1(57.912,173.355) v1(57.912,176.149) v1(57.912,178.943) v1(57.912,181.737) v1(57.912,184.531) v1(57.912,187.325) v1(57.912,190.119)
  L3_PWR_SIG w0.5: v1(57.912,125.857) 57.912,125.83 58.228,125.514 58.228,122.07 58.236,122.063 58.236,121.85 v2(58.293,121.793)
DGND: C57.2 J9.2 U20.2 | length 4.4
  Top Copper w0.254: J9.2@114.882,178.194 114.897,178.194 114.897,178.134 115.526,177.505 115.877,177.505 116.273,177.109 116.273,176.608 116.553,176.328 U20.2@118.145,176.328
DRVOFF: Q2.3 R54.1 U20.21 | length 4
  L3_PWR_SIG w0.5: v1(127.177,170.357) 127.197,170.377 127.197,170.631 v1(129.857,173.291)
DVDD: C57.1 U20.1
  other v1: 116.287,179.966
ENC_A_TOP: J_LED_BLADE1.16 J_LED_CTRL1.16 J_LED_TOP_SLIP1.02 J_LED_TOP_SLIP2.02 R15.1 U6.6 X3.A1 | length 157.4
  Top Copper w0.2: U6.6@110.42,143.751 110.42,144.583
  Top Copper w0.25: 110.42,144.583 110.445,144.608 110.445,144.895 110.323,145.017 110.323,146.095 109.973,146.445 109.973,148.582 111.488,150.097 111.612,150.097 R15.1@111.887,150.372 ; R15.1@111.887,150.407 R15.1@111.975,150.495
  Top Copper w0.3: R15.1@111.975,150.495 v1(113.03,150.495)
  Top Copper w0.5: J_LED_TOP_SLIP2.02@108.458,98.171 124.439,98.171 X3.A1@127.099,95.511
  L3_PWR_SIG w0.3: J_LED_BLADE1.16@48.641,94.615 48.641,98.171 48.133,98.679 48.133,189.571 49.294,190.732 61.292,190.732 61.468,190.556 61.468,188.707 60.773,188.012 60.773,183.829 62.484,182.118 J_LED_TOP_SLIP1.02@62.738,182.118
  Bottom Copper w0.3: J_LED_CTRL1.16@107.696,157.48 108.864,156.312 110.276,156.312 111.624,154.964 111.624,151.901 v1(113.03,150.495)
ENC_B_TOP: J_LED_BLADE1.17 J_LED_CTRL1.17 J_LED_TOP_SLIP1.04 J_LED_TOP_SLIP2.04 R16.1 U6.7 X3.B1 | length 158.2
  Top Copper w0.2: R16.1@109.728,150.28 109.728,149.49 109.598,149.36 109.598,146.29 109.92,145.968 109.92,144.552 109.997,144.475 109.997,143.774 U6.7@110.02,143.751
  Top Copper w0.3: R16.1@109.728,150.28 109.816,150.368 v1(110.744,150.368)
  Top Copper w0.5: J_LED_TOP_SLIP2.04@105.918,98.171 107.333,96.756 120.854,96.756 X3.B1@122.099,95.511
  L3_PWR_SIG w0.3: 50.673,92.71 49.83,93.553 48.201,93.553 47.579,94.175 47.579,95.055 47.879,95.355 47.879,96.393 44.026,100.246 44.026,121.887 44.611,122.472 44.611,190.906 45.337,191.632 62.068,191.632 62.495,191.205 62.495,188.461 61.673,187.639 61.673,185.723 J_LED_TOP_SLIP1.04@62.738,184.658
  Bottom Copper w0.3: J_LED_CTRL1.17@110.236,154.94 110.026,154.73 110.026,154.26 109.982,154.216 109.982,151.175 110.744,150.413 v1(110.744,150.368)
Fdbk: R6.1 R8.2 U2.4 | length 1.4
  Top Copper w0.3: R6.1@43.942,78.588 43.942,77.204 43.967,77.179 U2.4@43.983,77.179
G0: LED1.2 LED4.2 LED7.2 LED10.2 LED97.2 LED100.2 LED103.2 LED106.2 LED193.2 LED196.2 LED199.2 LED202.2 U10.9 | length 77.5
  Top Copper w0.3: LED199.2@28.6,125.07 29.176,125.07 29.31,124.936 v1(29.391,124.936) ; LED202.2@31.521,125.07 v1@32.097,125.07 ; LED193.2@34.315,125.07 v1@34.891,125.07 ; LED196.2@37.109,125.07 v1@37.685,125.07 ; LED103.2@39.903,125.07 v1@40.479,125.07 ; LED106.2@42.697,125.07 v1@43.273,125.07 ; LED97.2@45.491,125.07 45.533,125.028 46.029,125.028 v1(46.086,124.971) ; LED100.2@48.285,125.07 48.361,124.994 48.773,124.994 v1(48.83,124.936) ; 51.206,125.07 51.235,125.041 51.633,125.041 v1(51.691,124.984) ; 54,125.07 v1(54.418,125.07) ; 56.794,125.07 56.87,124.994 57.155,124.994 v1(57.212,124.936) ; LED4.2@59.4,125.07 59.415,125.055 59.415,124.481 v1(59.436,124.46)
  L3_PWR_SIG w0.3: v3(49.557,99.195) 49.064,99.688 49.064,99.834 48.795,100.103 48.795,110.393 48.953,110.551 48.953,110.678 49.583,111.308 49.583,111.841 59.528,121.786 59.528,123.678 59.493,123.712 59.493,124.403 v1(59.436,124.46)
  Bottom Copper w0.3: v1(29.391,124.936) v1@29.423,124.968 ; v3(49.557,99.195) 49.584,99.195 49.854,98.925 49.991,98.925 52.465,96.451 55.568,96.451 56.057,96.94 56.057,98.861 U10.9@56.057,99.176 ; 58.883,124.968 59.391,124.46 v1(59.436,124.46)
  Bottom Copper w0.4: v1@29.423,124.968 29.455,124.936 32.084,124.936 32.116,124.968 32.148,124.936 34.878,124.936 34.91,124.968 34.929,124.949 37.678,124.949 37.701,124.973 40.493,124.973 40.507,124.959 43.352,124.959 43.361,124.968 43.375,124.953 46.069,124.953 v1(46.086,124.971) ; v1@46.086,124.953 48.813,124.953 48.819,124.96 51.667,124.96 51.679,124.972 v1(51.691,124.984) ; v1@51.691,124.96 51.733,124.96 51.756,124.984 53.318,124.984 53.404,125.07 v1(54.418,125.07) ; v1@54.47,125.03 54.51,125.07 56.112,125.07 56.246,124.936 v1(57.212,124.936) ; v1@57.245,124.968 58.883,124.968
  other v1: 32.116,124.936 34.91,124.936 43.361,124.936 37.697,124.963 40.498,124.983
G1: LED13.2 LED16.2 LED19.2 LED22.2 LED109.2 LED112.2 LED115.2 LED118.2 LED205.2 LED208.2 LED211.2 LED214.2 U10.12 | length 79.4
  Top Copper w0.3: LED211.2@28.6,127.87 28.615,127.855 29.148,127.855 29.241,127.762 v1(29.322,127.762) ; LED214.2@31.536,127.855 v1@32.069,127.855 ; LED205.2@34.33,127.855 v1@34.863,127.855 ; LED208.2@37.124,127.855 v1@37.657,127.855 ; LED115.2@39.918,127.855 v1@40.451,127.855 ; LED118.2@42.712,127.855 v1@43.245,127.855 ; LED109.2@45.506,127.855 v1@46.039,127.855 ; LED112.2@48.3,127.855 v1@48.833,127.855 ; 51.221,127.855 v1@51.754,127.855 ; 54.015,127.855 v1@54.548,127.855 ; 56.809,127.855 v1@57.342,127.855 ; LED16.2@59.4,127.87 59.832,127.438 60.014,127.438 v1(60.071,127.381)
  L3_PWR_SIG w0.3: v3(54.241,98.105) 51.755,98.105 49.245,100.615 49.245,108.265 49.403,108.423 49.403,110.492 50.919,112.008 50.919,112.541 60.19,121.812 60.19,127.055 60.128,127.117 60.128,127.324 v1(60.071,127.381)
  Bottom Copper w0.3: v3(54.241,98.105) 54.241,98.132 54.454,98.345 54.454,98.415 54.557,98.518 U10.12@54.557,99.176
  Bottom Copper w0.4: v1(26.401,127.762) v1(29.322,127.762) v1(32.116,127.762) v1(34.91,127.762) v1(37.704,127.762) v1(40.498,127.762) v1(43.307,127.762) v1(46.086,127.762) v1(48.88,127.762) v1(51.674,127.762) v1(54.483,127.762) 59.636,127.762 60.017,127.381 v1(60.071,127.381)
  other v1: 57.262,127.762
G2: LED25.2 LED28.2 LED31.2 LED34.2 LED121.2 LED124.2 LED127.2 LED130.2 LED217.2 LED220.2 LED223.2 LED226.2 U10.15 | length 78.7
  Top Copper w0.3: LED223.2@28.6,130.67 28.615,130.655 29.142,130.655 29.241,130.556 v1(29.322,130.556) ; LED226.2@31.536,130.655 v1@32.063,130.655 ; LED217.2@34.33,130.655 v1@34.857,130.655 ; LED220.2@37.124,130.655 v1@37.651,130.655 ; LED127.2@39.918,130.655 v1@40.445,130.655 ; LED130.2@42.712,130.655 v1@43.239,130.655 ; LED121.2@45.506,130.655 v1@46.033,130.655 ; LED124.2@48.3,130.655 v1@48.827,130.655 ; 51.221,130.655 v1@51.748,130.655 ; 54.015,130.655 v1@54.542,130.655 ; 56.809,130.655 v1@57.336,130.655 ; LED28.2@59.4,130.67 59.415,130.655 59.86,130.655 59.959,130.556 v1(60.04,130.556)
  L3_PWR_SIG w0.3: v3(51.632,99.452) 51.297,99.452 49.695,101.054 49.695,108.079 49.853,108.237 49.853,110.306 51.369,111.822 51.369,112.354 60.64,121.625 60.64,127.101 60.671,127.132 60.671,128.419 60.04,129.05 v1(60.04,130.556)
  Bottom Copper w0.3: v3(51.632,99.452) 51.651,99.471 51.651,99.518 52.019,99.886 U10.15@52.846,99.886
  Bottom Copper w0.4: v1(26.401,130.556) v1(29.322,130.556) v1(32.116,130.556) v1(34.91,130.556) v1(37.704,130.556) v1(40.498,130.556) v1(43.307,130.556) v1(46.086,130.556) v1(48.88,130.556) v1(51.674,130.556) v1(54.483,130.556) v1(57.262,130.556) v1(60.04,130.556)
G3: LED41.2 LED42.2 LED47.2 LED48.2 LED137.2 LED138.2 LED143.2 LED144.2 LED237.2 LED238.2 LED239.2 LED240.2 U10.18 | length 79.8
  Top Copper w0.3: LED239.2@28.6,133.47 28.615,133.455 29.136,133.455 29.241,133.35 v1(29.322,133.35) ; LED240.2@31.536,133.455 v1@32.057,133.455 ; LED237.2@34.33,133.455 v1@34.851,133.455 ; LED238.2@37.124,133.455 v1@37.645,133.455 ; LED143.2@39.918,133.455 v1@40.439,133.455 ; LED144.2@42.712,133.455 v1@43.233,133.455 ; LED137.2@45.506,133.455 v1@46.027,133.455 ; LED138.2@48.3,133.455 v1@48.821,133.455 ; 51.221,133.455 v1@51.742,133.455 ; 54.015,133.455 v1@54.536,133.455 ; 56.809,133.455 v1@57.33,133.455 ; LED42.2@59.4,133.47 59.415,133.455 59.885,133.455 59.99,133.35 v1(60.071,133.35)
  L3_PWR_SIG w0.4: v3(51.435,101.346) 50.195,102.586 50.195,107.872 50.366,108.043 50.366,110.111 51.544,111.289 52.38,111.289 53.479,112.388 53.479,113.087 53.902,113.509 53.902,114.18 61.14,121.418 61.14,126.499 61.171,126.53 61.171,131.233 60.071,132.333 v1(60.071,133.35)
  Bottom Copper w0.4: v1(26.401,133.35) v1(29.322,133.35) v1(32.116,133.35) v1(34.91,133.35) v1(37.704,133.35) v1(40.498,133.35) v1(43.307,133.35) v1(46.086,133.35) v1(48.88,133.35) v1(51.674,133.35) v1(54.483,133.35) v1(57.262,133.35) v1(60.071,133.35) ; v3(51.435,101.346) 51.475,101.386 U10.18@52.846,101.386
G4: LED49.2 LED52.2 LED55.2 LED58.2 LED145.2 LED148.2 LED151.2 LED154.2 LED241.2 LED244.2 LED247.2 LED250.2 U10.21 | length 81.6
  Top Copper w0.3: LED247.2@28.6,136.27 28.615,136.255 29.13,136.255 29.241,136.144 v1(29.322,136.144) ; LED250.2@31.536,136.255 v1@32.051,136.255 ; LED241.2@34.33,136.255 v1@34.845,136.255 ; LED244.2@37.124,136.255 v1@37.639,136.255 ; LED151.2@39.918,136.255 v1@40.433,136.255 ; LED154.2@42.712,136.255 v1@43.227,136.255 ; LED145.2@45.506,136.255 v1@46.021,136.255 ; LED148.2@48.3,136.255 v1@48.815,136.255 ; 51.221,136.255 v1@51.736,136.255 ; 54.015,136.255 v1@54.53,136.255 ; 56.809,136.255 v1@57.324,136.255 ; LED52.2@59.4,136.27 59.415,136.255 59.879,136.255 59.99,136.144 v1(60.071,136.144)
  L3_PWR_SIG w0.3: v3(51.943,102.87) 51.924,102.889 51.758,102.889 50.695,103.952 50.695,107.664 50.866,107.835 50.866,109.904 51.452,110.49 53.687,110.49 61.678,118.481 61.678,133.481 60.071,135.088 v1(60.071,136.144)
  Bottom Copper w0.3: v3(51.943,102.87) 51.96,102.887 U10.21@52.846,102.887
  Bottom Copper w0.4: v1(26.401,136.144) v1(29.322,136.144) v1(32.116,136.144) v1(34.91,136.144) v1(37.704,136.144) v1(40.498,136.144) v1(43.307,136.144) v1(46.086,136.144) v1(48.88,136.144) v1(51.674,136.144) v1(54.483,136.144) v1(57.262,136.144) v1(60.071,136.144)
G5: LED61.2 LED64.2 LED67.2 LED70.2 LED157.2 LED160.2 LED163.2 LED166.2 LED253.2 LED256.2 LED259.2 LED262.2 U10.24 | length 83.4
  Top Copper w0.3: LED259.2@28.6,139.07 28.615,139.055 29.124,139.055 29.241,138.938 v1(29.322,138.938) ; LED262.2@31.536,139.055 v1@32.045,139.055 ; LED253.2@34.33,139.055 v1@34.839,139.055 ; LED256.2@37.124,139.055 v1@37.633,139.055 ; LED163.2@39.918,139.055 v1@40.427,139.055 ; LED166.2@42.712,139.055 v1@43.221,139.055 ; LED157.2@45.506,139.055 v1@46.015,139.055 ; LED160.2@48.3,139.055 v1@48.809,139.055 ; 51.221,139.055 v1@51.73,139.055 ; 54.015,139.055 v1@54.524,139.055 ; 56.809,139.055 v1@57.318,139.055 ; LED64.2@59.4,139.07 59.415,139.055 59.873,139.055 59.99,138.938 v1(60.071,138.938)
  L3_PWR_SIG w0.3: v3(51.887,104.387) 51.145,105.129 51.145,107.395 51.316,107.566 51.316,108.991 51.55,109.225 54.869,109.225 62.128,116.484 62.128,135.825 60.071,137.882 v1(60.071,138.938)
  Bottom Copper w0.3: v3(51.887,104.387) 52.537,104.387 U10.24@52.846,104.387
  Bottom Copper w0.4: v1(26.401,138.938) v1(29.322,138.938) v1(32.116,138.938) v1(34.91,138.938) v1(37.704,138.938) v1(40.498,138.938) v1(43.307,138.938) v1(46.086,138.938) v1(48.88,138.938) v1(51.674,138.938) v1(54.483,138.938) v1(57.262,138.938) v1(60.071,138.938)
G6: LED73.2 LED75.2 LED77.2 LED79.2 LED169.2 LED171.2 LED173.2 LED175.2 LED265.2 LED267.2 LED269.2 LED271.2 U10.31 | length 80.1
  Top Copper w0.3: LED269.2@28.6,141.87 28.615,141.855 29.118,141.855 29.241,141.732 v1(29.322,141.732) ; LED271.2@31.536,141.855 v1@32.039,141.855 ; LED265.2@34.33,141.855 v1@34.833,141.855 ; LED267.2@37.124,141.855 v1@37.627,141.855 ; LED173.2@39.918,141.855 v1@40.421,141.855 ; LED175.2@42.712,141.855 v1@43.215,141.855 ; LED169.2@45.506,141.855 v1@46.009,141.855 ; LED171.2@48.3,141.855 v1@48.803,141.855 ; 51.221,141.855 v1@51.724,141.855 ; 54.015,141.855 v1@54.518,141.855 ; 56.809,141.855 v1@57.312,141.855 ; LED75.2@59.4,141.87 59.415,141.855 59.867,141.855 59.99,141.732 v1(60.071,141.732)
  L3_PWR_SIG w0.3: v3(53.978,108.334) 54.006,108.334 54.446,108.775 55.181,108.775 62.578,116.172 62.578,139.225 v1(60.071,141.732)
  Bottom Copper w0.3: v3(53.978,108.334) 54.48,107.833 54.48,107.624 54.557,107.547 U10.31@54.557,107.097
  Bottom Copper w0.4: v1(26.401,141.732) v1(29.322,141.732) v1(32.116,141.732) v1(34.91,141.732) v1(37.704,141.732) v1(40.498,141.732) v1(43.307,141.732) v1(46.086,141.732) v1(48.88,141.732) v1(51.674,141.732) v1(54.483,141.732) v1(57.262,141.732) v1(60.071,141.732)